# Altium PCB PCB1.PcbDoc
Units mm, origin at the board's own origin, x right, y up, seen from the top; angles counter-clockwise.
Board outline 29.21 x 17.4 mm, 2 copper layers (Top Layer, Bottom Layer); 16 components, 10 nets, 49 pads, 4 vias.
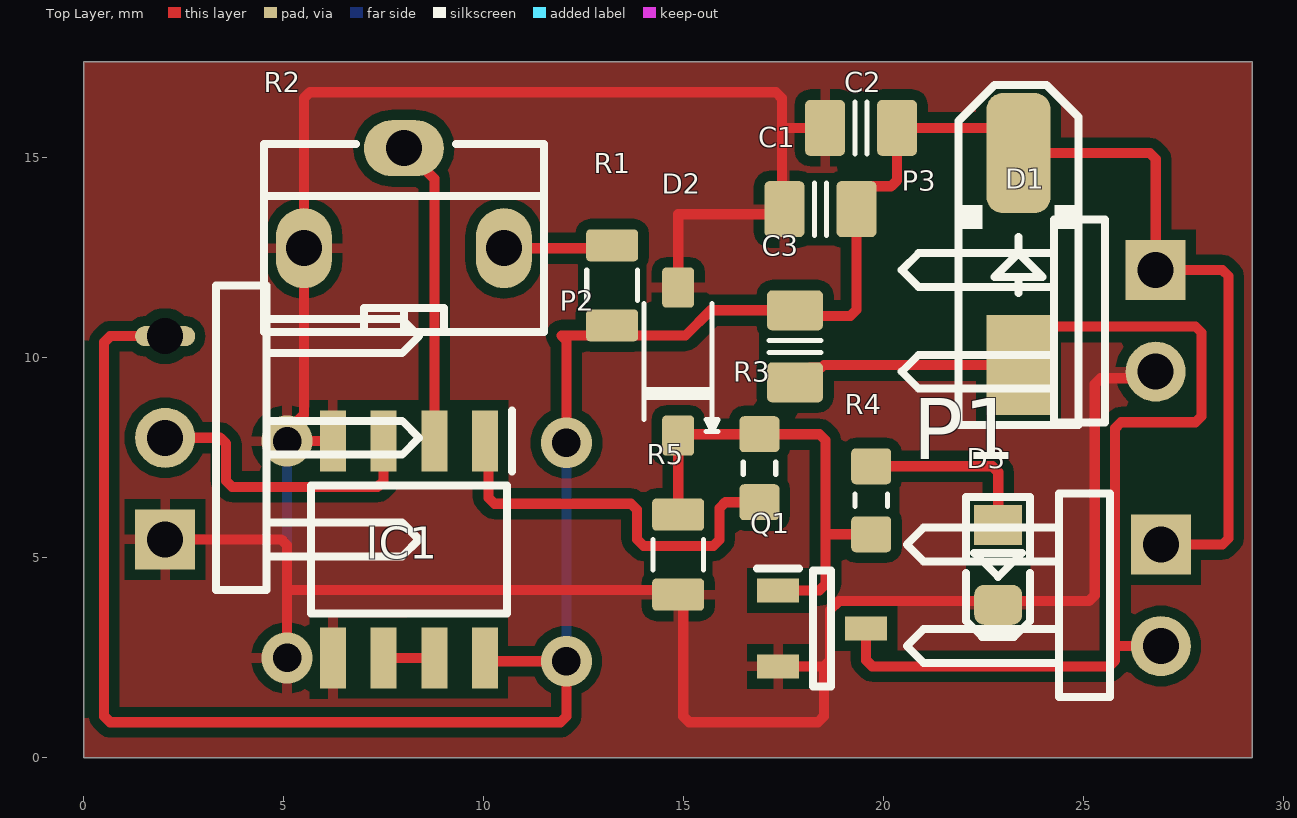
[diagram p0: Top Layer view]
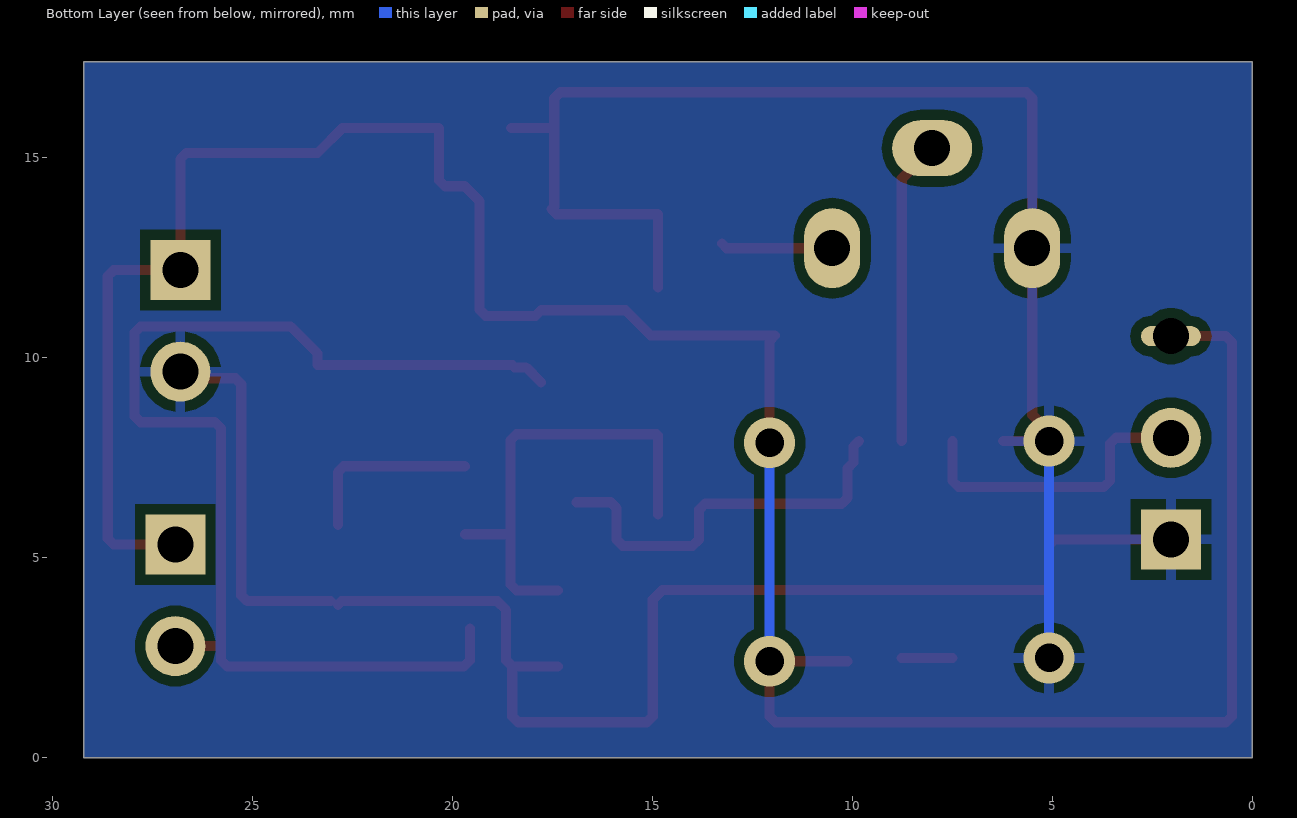
[diagram p1: Bottom Layer view, seen from below]
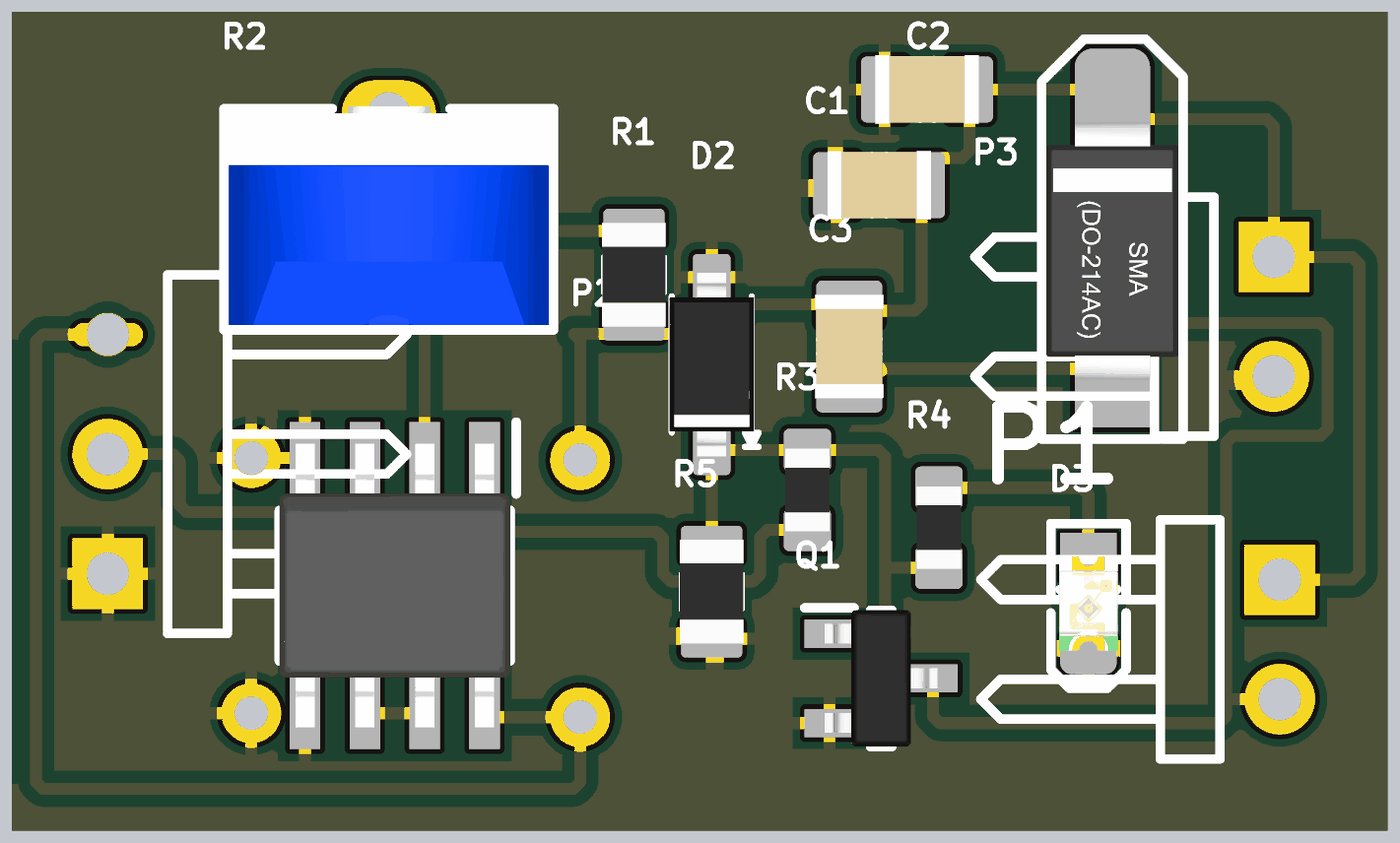
[diagram p2: 3D render of the assembled board from above, using the file's embedded part models]

## Layer stack, top to bottom
Top Solder: solder mask 0.0102, Solder Resist, Dk 3.5
Top Layer: signal copper 0.0356
Dielectric 1: dielectric 0.32, FR-4, Dk 4.8
Bottom Layer: signal copper 0.0356
Bottom Solder: solder mask 0.0102, Solder Resist, Dk 3.5

## Board outline
0,0 29.21,0 29.21,17.399 0,17.399

## Design rules (kind name [scope] priority, off if disabled: settings)
Clearance [All] p1: gap=0.254 ignorepadtopadclearanceinfootprint=TRUE
HoleToHoleClearance [All] p1: gap=0 allowstackedmicrovias=TRUE
MinimumSolderMaskSliver [All] p1: minsoldermaskwidth=0
PolygonConnect [All] p1: connectstyle=Relief reliefconductorwidth=0.254 reliefentries=4 polygonreliefangle="90 Angle" airgapwidth=0.254
RoutingVias [All] p1: holewidth=0.3 width=0.5 viastyle="Through Hole" minholewidth=0.3 minwidth=0.5 maxholewidth=2.5 maxwidth=2.5
SilkToSilkClearance [All] p1: silktosilkclearance=0
SilkToSolderMaskClearance [IsPad] p1: minsilkscreentomaskgap=0 clearancetoexposedcopper=TRUE
SolderMaskExpansion [All] p1: expansion=0.102 istentingtop=FALSE
UnRoutedNet [All] p1: checkbadconnections=TRUE
Width [All] p1: maxlimit=0.254 minlimit=0.254 preferedwidth=0.254
25 further rules are at their usual default settings.

## Components (designator, comment, footprint, x,y, rotation, side; value= is the part's Value field where it differs from the comment)
C1 "approved sub OK" CAPC2012X135N 18.415,13.716 r180 top value=100n
C2 "approved sub OK" CAPC2012X135N 19.431,15.748 r180 top value=10µ
C3 "approved sub OK" CAPC2012X135N 17.78,10.287 r270 top value=10µ
D1 "1N4007" D_SMA 23.368,12.319 r90 top
D2 "4.7V" SOD123 14.859,9.906 r90 top
D3 "LED805RED" LED0805RED 22.86,4.826 r270 top
IC1 "LM358D" SOIC127P600X175-8N 8.128,5.207 r270 top
P1 "FAN" HDR1X2H 26.924,5.334 r270 top
P2 "LM35" HDR1X3H 2.032,5.461 r90 top
P3 "5-12V" HDR1X2H 26.797,12.192 r270 top
Q1 "SI2302DS" SOT95P230X110-3N 18.458,3.236 r0 top
R1 "Thick Film" RESC2012X70N 13.208,11.811 r90 top value=10K
R2 "2K" POT_3306W 8.001,12.74 r0 top
R3 "Thick Film" RESC1608X55N 16.891,7.239 r90 top value=470R
R4 "Thick Film" RESC1608X55N 19.685,6.438 r270 top value=470R
R5 "Thick Film" RESC2012X70N 14.859,5.08 r270 top value=10K

## Footprints (in the part's own frame and the unit in brackets; to place one, negate y for a bottom-side part, rotate by r counter-clockwise, add the part's x,y. Pads: shape width x height; smd on the part's side, far side on the other; paste and mask are expansions set on the pad)
CAPC2012X135N [mm] "Chip Capacitor, Body 2.0x1.2mm, EIA 0805, IPC Medium Density"
  round 0.254 on Mech15: 0(0,0)
  rrect25% 1x1.4 smd: 1(-0.9,0) 2(0.9,0)
  Top Layer pour cut-out: -0.675,0.7 -0.475,0.9 0.475,0.9 0.675,0.7 0.675,-0.7 0.475,-0.9 -0.475,-0.9 -0.675,-0.7
  silkscreen extent -0.15,-0.65 0.15,0.65, body extent -1.1,-0.72 1.1,0.73, height 1.34
D_SMA [mm] "SMA Molded Diode, 2-Leads, Body 4.3x2.7mm, SOD-128"
  rect 2.5x1.6 smd: 1(-2.5,0)
  rrect50% 3x1.6 smd: 2(2.8,0)
  silkscreen extent -4,-1.5 4.5,1.5, body extent -2.75,-1.4 2.75,1.4, height 2.6
HDR1X2H [mm] "Connector; Header; 2 Position; Right Angle"
  rect 1.5x1.5 hole 0.9: 1(0,0)
  round 1.5 hole 0.9: 2(2.54,0)
  silkscreen extent -1.27,-6.35 3.81,-1.27
HDR1X3H [mm] "Connector; Header; 3 Position; Right Angle"
  rect 1.5x1.5 hole 0.9: 1(0,0)
  round 1.5 hole 0.9: 2(2.54,0)
  oval 0.5x1.5 hole 0.9: ""(5.08,0)
  silkscreen extent -1.27,-6.35 6.35,-1.27
LED0805RED [mm] "LED SMD 0805, RED"
  rect 1x1.2 smd mask+0.075: 1(-1,0)
  rrect50% 1x1.2 smd mask+0.075: 2(1,0)
  Top Layer pour cut-out: -0.5,0.8 0.5,0.8 0.5,-0.8 -0.5,-0.8
  silkscreen extent -1.7,-0.8 1.8,0.8, body extent -1,-0.63 1,0.63, height 0.7
POT_3306W [mm] "POT, TRIM, 4.5X6.8mm 3306W"
  oval 1.4x2 / inner round 1.2 / far side oval 1.4x2 hole 0.9: 1(-2.5,0) 3(2.5,0)
  oval 2x1.4 / inner round 1.2 / far side oval 2x1.4 hole 0.9: 2(0,2.5)
  silkscreen extent -3.5,-2.1 3.5,2.6, body extent -3.4,-2 3.4,2.65, height 8.4
RESC1608X55N [mm] "Chip Resistor, Body 1.6x0.8mm, EIA 0603, IPC Medium Density"
  round 0.254 on Mech15: 0(0,0)
  rrect25% 0.9x1 smd: 1(-0.85,0) 2(0.85,0)
  Top Layer pour cut-out: -0.6,0.5 -0.4,0.7 0.4,0.7 0.6,0.5 0.6,-0.5 0.4,-0.7 -0.4,-0.7 -0.6,-0.5
  silkscreen extent -0.15,-0.41 0.15,0.41, body extent -0.87,-0.47 0.88,0.48, height 0.54
RESC2012X70N [mm] "Chip Resistor, Body 2.0x1.2mm, EIA 0805, IPC Medium Density"
  round 0.254 on Mech15: 0(0,0)
  rrect25% 0.8x1.3 smd: 1(-1,0) 2(1,0)
  Top Layer pour cut-out: -0.725,0.65 -0.525,0.85 0.525,0.85 0.725,0.65 0.725,-0.65 0.525,-0.85 -0.525,-0.85 -0.725,-0.65
  silkscreen extent -0.38,-0.64 0.38,0.64, body extent -1.1,-0.67 1.1,0.68, height 0.69
SOD123 [mm] "SOD-123; 2 Leads; Body 2.7 x 1.6 mm, (LxW)"
  round 0.508 on Mech15: 0(0,0)
  rrect25% 1x0.8 smd: A(1.85,0) K(-1.85,0)
  silkscreen extent -1.75,-1 1.45,0.85, body extent -1.95,-0.9 1.95,0.9, height 1.18
SOIC127P600X175-8N [mm]
  rect 1.528x0.65 smd: 1(-2.711,1.905) 2(-2.711,0.635) 3(-2.711,-0.635) 4(-2.711,-1.905) 5(2.711,-1.905) 6(2.711,-0.635) 7(2.711,0.635) 8(2.711,1.905)
  silkscreen extent -3.47,-2.45 1.6,2.58, body extent -3.01,-2.45 3.01,2.45, height 1.63
SOT95P230X110-3N [mm]
  rect 1.05x0.6 smd: 1(-1.1,0.95) 2(-1.1,-0.95) 3(1.1,0)
  silkscreen extent -1.63,-1.45 0.23,1.5, body extent -1.2,-1.45 1.2,1.45, height 0.95

## Part data
C1: library part CAPC_100n_0805_X7R_50V_10%, "Capacitor SMD Cer 100nF 10% 50V X7R 0805", Manufacturer 1=Kemet, Manufacturer Part Number 1=C0805C104K5RACTU, Package / Case="0805 (2012 metric)", Ratings="50V; X7R", Supplier Part Number 1=399-1170-1-ND, Tolerance=±10%, Material=ceramic, SCDType=undef, Supplier 1=Digi-Key
C2 C3: library part CAPC_10u_0805_16V, "Capacitor SMD Cer 10uF 10% 16V X7R 0805", Manufacturer 1=Samsung, Manufacturer Part Number 1=CL21B106KBN, Package / Case="0805 (2012 metric)", Ratings="16V; X7R", Tolerance=±10%, Material=ceramic, SCDType=undef
D1: library part DIODE_SMD_1N4007, "DIODE, GENERAL PURPOSE, 1000V/1A", ASSEMBLY=ASSEMBLY, DESC=DESCRIPTION, MANF=Kingtronics, MANF_P#=M7, PARAM="1000V VRRM", PARAM2=1A, PRICE=PRICE
D2: library part DIODE_ZENER_4.7V_500mW, "Diode Zener SMD 4.7V 0.5W SOD-123", Manufacturer 1="Fairchild Semiconductor", Manufacturer Part Number 1=MMSZ4688, Package / Case=SOD-123, Ratings="4.7V; 0.5W; Vf=900mV @ 10mA", Supplier Part Number 1=MMSZ4688-ND, Tolerance=±5%, Diode Type=Zener, Material=Si, SCDType=source, Supplier 1=Digi-Key
D3: library part LED_SMD_0805_RED, "LED, SMD, 0805, RED", ASSEMBLY=ASSEMBLY, DESC=DESCRIPTION, MANF=MANF, MANF_P#=MANF_PART#, PARAM2=2.2V, PRICE=36t@Javan
IC1: "Integrated Circuit", Manufacturer_Name="Texas Instruments", Mouser Part Number=595-LM358D, Arrow Part Number=LM358D, Arrow Price/Stock=https://www.arrow.com/en/products/lm358d/texas-instruments?region=nac, Datasheet Link=http://www.ti.com/lit/ds/symlink/lm358.pdf, Height=1.75mm, Manufacturer_Part_Number=LM358D, Mouser Price/Stock=https://www.mouser.co.uk/ProductDetail/Texas-Instruments/LM358D?qs=X1HXWTtiZ0RJBM%2FvBfVo8g%3D%3D
P1 P3: library part "Header 2H", "Header, 2-Pin, Right Angle", LatestRevisionDate=17-Jul-2002, LatestRevisionNote="Re-released for DXP Platform.", Publisher="Altium Limited"
P2: library part "Header 3H", "Header, 3-Pin, Right Angle", LatestRevisionDate=17-Jul-2002, LatestRevisionNote="Re-released for DXP Platform.", Publisher="Altium Limited"
Q1: "MOSFET (N-Channel)", Manufacturer_Name=Nexperia, Mouser Part Number=N/A, Datasheet Link=https://assets.nexperia.com/documents/data-sheet/SI2302DS.pdf, Height=1.1mm, Manufacturer_Part_Number=SI2302DS, Mouser Price/Stock=https://www.mouser.com/Search/Refine.aspx?Keyword=N%2FA
R1 R5: library part RES_10K_0805_5%, "Resistor SMD chip 10k Ohm 0.125W 5% 0805", Manufacturer 1=Yageo, Manufacturer Part Number 1=RC0805JR-0710KL, Package / Case="0805 (2012 metric)", Ratings="1/8 W", Supplier Part Number 1=311-10KARCT-ND, Tolerance=±5%, Material="Thick Film", SCDType=spec, Supplier 1=Digi-Key
R2: library part RES_THD_POT_3306W, "RESISTOR, THD, Potentiometer"
R3 R4: library part RES_470R_0603_5%, "Resistor SMD chip 470 Ohm 0.1W 5% 0603", Manufacturer 1=Vishay/Dale, Manufacturer Part Number 1=CRCW0603470RJNEA, Package / Case="0603 (1608 metric)", Ratings="1/10 W", Supplier Part Number 1=541-470GCT-ND, Tolerance=±5%, Material="Thick Film", SCDType=spec, Supplier 1=Digi-Key

## Via types
v1: diameter 1.27, hole 0.711, Top Layer to Bottom Layer, 4 vias

## Nets (pads, with @x,y where several pads share a name; then routed paths per layer and width w, separated by ;. In a path a pad name is that pad's centre, name@x,y a point inside that pad or via, vN(x,y) a via of type N, cw(c..) or ccw(c..) an arc to the next point about the centre after c; other vN are vias at no path point)
GND: C1.2 C2.2 D2.A D3.2 IC1.4 IC1.5 P2.1 P3.2 Q1.2 R2.1 R5.2 | length 75.5
  Top Layer w0.254: P2.1 4.931,5.461 5.08,5.312 5.08,4.191 ; v1(5.08,2.496) 5.08,4.191 ; IC1.4 v1(5.08,7.918) 5.08,8.154 5.501,8.575 R2.1 5.501,16.488 5.65,16.637 17.303,16.637 17.451,16.488 17.451,13.78 C1.2 17.388,13.589 14.859,13.589 D2.A ; Q1.2 18.501,2.286 ; 17.6,15.748 C2.2 ; D3.2 22.769,3.917 18.875,3.917 18.652,3.694 18.652,2.435 18.503,2.286 18.501,2.286 ; D3.2@23.051,3.917 25.124,3.917 25.273,4.066 25.273,9.338 25.422,9.487 26.632,9.487 P3.2 ; 5.08,4.191 14.748,4.191 R5.2 14.986,3.953 14.986,1.038 15.135,0.889 18.352,0.889 18.501,1.038 18.501,2.286
  Bottom Layer w0.254: v1(5.08,2.496) v1(5.08,7.918)
NetC3_2: C3.2 D1.1 P1.2 Q1.3 | length 29.4
  Top Layer w0.254: C3.2 18.153,9.76 18.443,9.76 18.502,9.819 D1.1 23.368,10.11 24.041,10.783 27.791,10.783 27.94,10.634 27.94,8.538 27.791,8.389 25.93,8.389 25.781,8.24 25.781,2.794 ; Q1.3 19.558,2.435 19.707,2.286 25.632,2.286 25.781,2.435 25.781,2.794 ; P1.2 25.781,2.794
NetD2_K: D2.K Q1.1 R3.2 R4.2 R5.1 | length 11.7
  Top Layer w0.254: R5.1 D2.K 14.892,8.089 R3.2 18.393,8.089 18.542,7.94 18.542,5.588 ; Q1.1 18.393,4.186 18.542,4.335 18.542,5.588 ; R4.2 18.542,5.588
NetD3_1: D3.1 R4.1 | length 4.5
  Top Layer w0.254: R4.1 22.711,7.288 22.86,7.139 D3.1
NetIC1_1: IC1.1 R3.1 | length 10.2
  Top Layer w0.254: IC1.1@9.835,7.918 9.968,7.785 9.968,7.388 10.116,7.239 10.116,6.499 10.265,6.35 13.679,6.35 13.828,6.201 13.828,5.463 13.992,5.299 15.741,5.299 15.89,5.448 15.89,6.24 16.039,6.389 R3.1
NetIC1_2: IC1.2 R2.2 | length 7.6
  Top Layer w0.254: R2.2 8.763,14.478 IC1.2
NetIC1_3: IC1.3 P2.2 | length 7.6
  Top Layer w0.254: P2.2 3.407,8.001 3.556,7.852 3.556,6.922 3.705,6.773 7.344,6.773 7.493,6.922 IC1.3
NetIC1_6: IC1.6 IC1.7 | length 1.3
  Top Layer w0.254: IC1.6 IC1.7
NetR1_2: R1.2 R2.3 | length 2.8
  Top Layer w0.254: R2.3 13.137,12.74 R1.2@13.256,12.859
VCC: C1.1 C2.1 C3.1 D1.2 IC1.8 P1.1 P2. P3.1 R1.1 | length 66.9
  Top Layer w0.254: P2. 0.657,10.541 0.508,10.392 0.508,1.038 0.657,0.889 11.916,0.889 12.065,1.038 v1(12.065,2.413) IC1.8@10.116,2.413 ; v1(12.065,7.874) 12.065,10.43 11.938,10.557 15.04,10.557 15.67,11.187 C3.1 17.918,11.049 19.166,11.049 19.315,11.198 19.315,13.916 19.688,14.289 20.182,14.289 20.331,14.438 C2.1@20.331,15.696 ; C2.1 22.739,15.748 D1.2 26.648,15.119 26.797,14.97 P3.1 28.466,12.192 28.614,12.043 28.614,5.483 28.466,5.334 P1.1
  Bottom Layer w0.254: v1(12.065,2.413) v1(12.065,7.874)
pads on no net: C1.0 C2.0 C3.0 D2.0 R1.0 R3.0 R4.0 R5.0

## Polygon pours and split planes (outlines as drawn)
GND on Bottom Layer "GND_L02_P001" (solid, remove dead copper, pour order 1): 0,17.399 29.21,17.399 29.21,0 0,0
GND on Top Layer "GND_L01_P000" (solid, remove dead copper, pour order 0): 0,17.399 29.21,17.399 29.21,0 0,0